# Altium PCB PCB1.PcbDoc (part 2 of 3)
Units mm, origin at the board's own origin, x right, y up, seen from the top; angles counter-clockwise.
Board outline 35.05 x 35.05 mm, 2 copper layers (Top Layer, Bottom Layer); 270 components, 213 nets, 927 pads, 0 vias.
Unrouted connection lines stored in the file: 589.
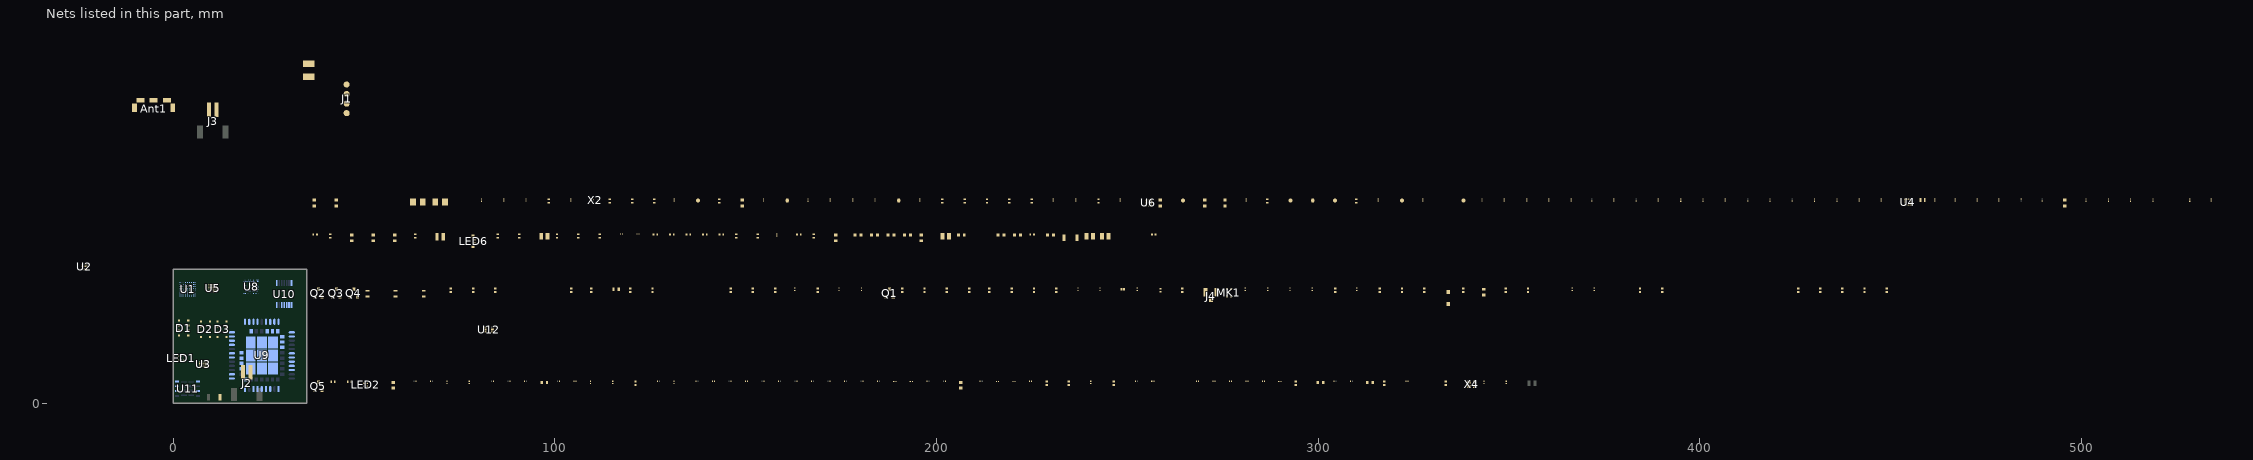
[diagram p2: the nets of this part, all layers, seen from the top]

## Part data (continued)
C17 C18: library part CC0603MRX5R5BB226, "CAP CER 22UF 6.3V X5R 0603", Case Code (Imperial)=0603, Case Code (Metric)=1608, Dielectric=X5R, LCSC Part Number=C109448, Manufacturer=Yageo, Max Operating Temperature=85°C, Min Operating Temperature=-55°C, Package Quantity=4000, Resistor Type=Ceramic, Supplier Part Number 1=603-CC603MRX5R5BB226, Tolerance=20%, Voltage Rating=6.3V, Capacitance=22uF, Case/Package=0603, Category="Ceramic Capacitors", ComponentLink1Description=http://www.mouser.com/ds/2/447/Yageo_UPY-GP_NP0_16V-to-50V_9-358835.pdf?src-supplier=Mouser, ComponentLink1URL=http://www.mouser.com/ds/2/447/Yageo_UPY-GP_NP0_16V-to-50V_9-358835.pdf?src-supplier=Mouser, ComponentLink2Description=http://www.yageo.com/documents/recent/UPY-GPHC_X5R_4V-to-50V_25.pdf?src-supplier=Digi-Key, ComponentLink2URL=http://www.yageo.com/documents/recent/UPY-GPHC_X5R_4V-to-50V_25.pdf?src-supplier=Digi-Key, Depth=0.8mm, Halogen Free="Halogen Free", Lead Free="Lead Free", Length=0.063inch, Manufacturer Part Number=CC0603MRX5R5BB226, Mount="Surface Mount", Packaging="Tape and Reel", Pricing 1="1=0.33000, 10=0.22500, 50=0.22500, 100=0.12800, 1000=0.07900, 10000=0.06500 (USD)", RoHS=Yes, RoHS Compliant=Yes, Stock 1=3030, Supplier 1=Mouser, Termination=SMD/SMT, Thickness=0.035inch, Voltage Rating (DC)=6.3V, Weight=7.1E-05oz, Width=0.031inch
C19 C21 C26: library part GRM033C81A105ME05D, "CAP CER 1UF 10V X6S 0201", Dielectric=1541DielectricType, LCSC Part Number=C237278, Manufacturer=Murata, Voltage Rating (DC)=10V, ComponentLink1Description=http://search.murata.co.jp/Ceramy/image/img/A01X/G101/ENG/GRM033C81A105ME05-01.pdf?src-supplier=Digikey, ComponentLink1URL=http://search.murata.co.jp/Ceramy/image/img/A01X/G101/ENG/GRM033C81A105ME05-01.pdf?src-supplier=Digikey, ComponentLink2Description=https://datasheet.octopart.com/GRM033C81A105ME05D-Murata-datasheet-86813717.pdf?src-supplier=Future+Electronics, ComponentLink2URL=https://datasheet.octopart.com/GRM033C81A105ME05D-Murata-datasheet-86813717.pdf?src-supplier=Future+Electronics, ComponentLink3Description=https://datasheet.octopart.com/GRM033C81A105ME05D-Murata-datasheet-165579666.pdf?src-supplier=TME, ComponentLink3URL=https://datasheet.octopart.com/GRM033C81A105ME05D-Murata-datasheet-165579666.pdf?src-supplier=TME, Height=390um, Item Type=Capacitors, Manufacturer Part Number=GRM033C81A105ME05D, Material=4241ConductorMaterial, Pricing="15000=0.0628, 30000=0.0611 (USD)", RoHS=Yes, Stock=165000, Supplier="Future Electronics"
C20 C23 C24 C25 C49 C52 C53 C54 C56 C57: library part GRM033C71C104KE14D, "CAP CER 0.1UF 16V X7S 0201", LCSC Part Number=C85923, Manufacturer=Murata, ComponentLink1Description=http://www.mouser.com/ds/2/281/c02e-2905.pdf?src-supplier=Mouser, ComponentLink1URL=http://www.mouser.com/ds/2/281/c02e-2905.pdf?src-supplier=Mouser, ComponentLink2Description=http://www.farnell.com/datasheets/2867828.pdf?src-supplier=Farnell, ComponentLink2URL=http://www.farnell.com/datasheets/2867828.pdf?src-supplier=Farnell, ComponentLink3Description=http://www.farnell.com/datasheets/2867828.pdf?src-supplier=Newark, ComponentLink3URL=http://www.farnell.com/datasheets/2867828.pdf?src-supplier=Newark, ComponentLink4Description=http://www.farnell.com/datasheets/2867828.pdf?src-supplier=Element14, ComponentLink4URL=http://www.farnell.com/datasheets/2867828.pdf?src-supplier=Element14, ComponentLink5Description=https://search.murata.co.jp/Ceramy/image/img/A01X/G101/ENG/GRM033C71C104KE14-01.pdf?src-supplier=Digikey, ComponentLink5URL=https://search.murata.co.jp/Ceramy/image/img/A01X/G101/ENG/GRM033C71C104KE14-01.pdf?src-supplier=Digikey, ComponentLink6Description=https://datasheet.octopart.com/GRM033C71C104KE14D-Murata-datasheet-22122223.pdf?src-supplier=Future+Electronics, ComponentLink6URL=https://datasheet.octopart.com/GRM033C71C104KE14D-Murata-datasheet-22122223.pdf?src-supplier=Future+Electronics, ComponentLink7Description=https://datasheet.octopart.com/GRM033C71C104KE14D-Murata-datasheet-165579666.pdf?src-supplier=TME, ComponentLink7URL=https://datasheet.octopart.com/GRM033C71C104KE14D-Murata-datasheet-165579666.pdf?src-supplier=TME, Item Type=Capacitors, Manufacturer Part Number=GRM033C71C104KE14D, Material=4241ConductorMaterial, Pricing="15000=0.0042, 45000=0.0041, 75000=0.004, 300000=0.0038, 450000=0.0037 (USD)", RoHS=Yes, Stock=15000, Supplier="Future Electronics"
C27 C28 C44 C45 C88 C89 C90 C91: library part GRM0335C1E2R0BA01D, "CAP CER 2PF 25V C0G/NP0 0201", LCSC Part Number=C161383, Manufacturer=Murata, Category="Ceramic Capacitors", ComponentLink1Description=https://datasheet.ciiva.com/29535/grm0335c1e2r0ba01-01-29535294.pdf?src-supplier=Digi-Key, ComponentLink1URL=https://datasheet.ciiva.com/29535/grm0335c1e2r0ba01-01-29535294.pdf?src-supplier=Digi-Key, Item Type=Capacitor, Manufacturer Part Number=GRM0335C1E2R0BA01D, Pricing 1="1=0.053, 10=0.0058, 25=0.004, 100=0.0026, 500=0.0024, 1000=0.0023, 3000=0.0022, 6000=0.0021, 15000=0.002, 30000=0.0019 (USD)", RoHS=Yes, Stock 1=65754, Supplier 1="Arrow Electronics", Supplier Part Number 1=GRM0335C1E2R0BA01D
C29: library part GRM033R71A472KA01D, "CAP CER 4700PF 10V X7R 0201", Case Code (Imperial)=0201, Case Code (Metric)=0603, Dielectric=X7R, LCSC Part Number=C85927, Manufacturer=Murata, Max Operating Temperature=125°C, Min Operating Temperature=-55°C, Package Quantity=1, Tolerance=10%, Voltage=10V, Case/Package=0201, ComponentLink1Description=https://datasheet.ciiva.com/129/product-129904.pdf?src-supplier=Digikey, ComponentLink1URL=https://datasheet.ciiva.com/129/product-129904.pdf?src-supplier=Digikey, ComponentLink2Description=https://datasheet.ciiva.com/129/grm033r71a472ka01-01-129903.pdf?src-supplier=Digikey, ComponentLink2URL=https://datasheet.ciiva.com/129/grm033r71a472ka01-01-129903.pdf?src-supplier=Digikey, ComponentLink3Description=https://datasheet.ciiva.com/18184/getdatasheetpartid-308657-18184073.pdf?src-supplier=Verical, ComponentLink3URL=https://datasheet.ciiva.com/18184/getdatasheetpartid-308657-18184073.pdf?src-supplier=Verical, ComponentLink4Description=https://datasheet.ciiva.com/29199/455736-da-01-en-vs-kondensator-0201-29199148.pdf?src-supplier=Conrad, ComponentLink4URL=https://datasheet.ciiva.com/29199/455736-da-01-en-vs-kondensator-0201-29199148.pdf?src-supplier=Conrad, ComponentLink5Description=https://datasheet.ciiva.com/7937/482872-7937598.pdf?src-supplier=Element14, ComponentLink5URL=https://datasheet.ciiva.com/7937/482872-7937598.pdf?src-supplier=Element14, ComponentLink6Description=https://datasheet.ciiva.com/7937/482872-7937597.pdf?src-supplier=Element14, ComponentLink6URL=https://datasheet.ciiva.com/7937/482872-7937597.pdf?src-supplier=Element14, ComponentLink7Description=https://datasheet.ciiva.com/129/grm033r71a472ka01-01-129905.pdf?src-supplier=Digikey, ComponentLink7URL=https://datasheet.ciiva.com/129/grm033r71a472ka01-01-129905.pdf?src-supplier=Digikey, ComponentLink8Description=https://datasheet.ciiva.com/11463/product-11463846.pdf?src-supplier=Avnet, ComponentLink8URL=https://datasheet.ciiva.com/11463/product-11463846.pdf?src-supplier=Avnet, Construction=Flat, Depth=0.3mm, Height=0.3mm, Item Type=Capacitors, Lead Free="Lead Free", Length=0.6mm, Manufacturer Part Number=GRM033R71A472KA01D, Material=Ceramic, Mounting Technology="Surface Mount", Packaging="Tape and Reel", Pricing="15000=0.0011, 75000=0.0011, 300000=0.001, 750000=0.001, 1875000=0.0009 (USD)", Radiation Hardening=No, Reach SVHC Compliant=No, RoHS=Yes, RoHS Compliant=Yes, Series=GRM, Stock=45000, Supplier="Future Electronics", Termination=SMD/SMT, Thickness=0.013inch, Voltage Rating=10V, Voltage Rating (DC)=10V, Width=0.012inch
C30 C39 C42: library part CC0402JRX7R9BB104, "CAP 0402 50V 100 NF X7R", Case/Package=343Case, Dielectric=1511DielectricType, LCSC Part Number=C5182432, Manufacturer=Yageo, Supplier Part Number=13-CC0402JRX7R9BB104TR-ND, Voltage Rating (DC)=50V, Category="Ceramic Capacitors", Item Type=Capacitor, Lead Free=5697LeadFree, Manufacturer Part Number=CC0402JRX7R9BB104, Pricing="10000=0.0157 (USD)", RoHS=No, Supplier=Digi-Key
C31: library part CC0603KRX7R0BB104, "CAP CER 0.1UF 100V X7R 0603", Capacitance=100nF, Case Code (Imperial)=0603, Case Code (Metric)=1608, Dielectric=X7R, LCSC Part Number=C113803, Manufacturer=Yageo, Max Operating Temperature=125°C, Min Operating Temperature=-55°C, Package Quantity=4000, Resistor Type=Ceramic, Supplier Part Number 1=311-1523-1-ND, Tolerance=10%, Voltage Rating=100V, Case/Package=0603, Category="Ceramic Capacitors", ComponentLink1Description=https://datasheet.ciiva.com/6277/mlccorderingcode-6277030.pdf?src-supplier=Digi-Key, ComponentLink1URL=https://datasheet.ciiva.com/6277/mlccorderingcode-6277030.pdf?src-supplier=Digi-Key, ComponentLink2Description=https://datasheet.ciiva.com/6277/mlccorderingcode-6277081.pdf?src-supplier=Digi-Key, ComponentLink2URL=https://datasheet.ciiva.com/6277/mlccorderingcode-6277081.pdf?src-supplier=Digi-Key, ComponentLink3Description=https://datasheet.ciiva.com/6277/mlccorderingcode-6277082.pdf?src-supplier=Digi-Key, ComponentLink3URL=https://datasheet.ciiva.com/6277/mlccorderingcode-6277082.pdf?src-supplier=Digi-Key, Depth=0.8mm, Item Type=Capacitor, Lead Free="Lead Free", Length=0.063inch, Manufacturer Part Number=CC0603KRX7R0BB104, Mount="Surface Mount", Packaging="Tape and Reel", Pricing 1="1=0.19000, 10=0.13500, 50=0.07680, 100=0.06370, 500=0.04466, 1000=0.03696 (USD)", RoHS=Yes, RoHS Compliant=Yes, Series=CC, Stock 1=60476, Supplier 1=Digi-Key, Termination=SMD/SMT, Thickness=0.035inch, Voltage Rating (DC)=100V, Weight=7.1E-05oz, Width=0.031inch
C32 C38 C40 C41: library part GRM188R61E106MA73J, "CAP CER 10UF 25V X5R 0603", Case Code (Imperial)=0603, Case Code (Metric)=1608, Dielectric=X5R, LCSC Part Number=C3833060, Manufacturer=Murata, Max Operating Temperature=85°C, Min Operating Temperature=-55°C, Package Quantity=10000, Supplier Part Number 1=490-12737-1-ND, Tolerance=20%, Voltage Rating=25V, Capacitance=10uF, Case/Package=0603, Composition=Ceramic, Height=0.8mm, Item Type=Capacitor, Length=0.063inch, Manufacturer Part Number=GRM188R61E106MA73J, Mount="Surface Mount", Packaging="Tape and Reel", Pricing 1="1=0.42, 10=0.293, 100=0.1756, 500=0.13172, 1000=0.11123, 2500=0.10537, 5000=0.09952 (USD)", Stock 1=47597, Supplier 1=Digi-Key, Termination=SMD/SMT, Thickness=0.039inch, Voltage Rating (DC)=25V, Weight=0.000222oz, Width=0.031inch
C33: library part 0603B105K250NT, "25V 1uF X7R ±10% 0603 Multilayer Ceramic Capacitors MLCC - SMD/SMT ROHS", LCSC Part Number=C59302, Manufacturer=FH, Package=0603, ComponentLink1Description=LCSC, ComponentLink1URL=https://www.lcsc.com/product-detail/Multilayer-Ceramic-Capacitors-MLCC-SMD-SMT_FH-Guangdong-Fenghua-Advanced-Tech-0603B105K250NT_C59302.html, Item Type=Capacitor, Manufacturer Part Number=0603B105K250NT
C34: library part GRM033R61A105ME15D, "CAP CER 1UF 10V X5R 0201", Dielectric=1537DielectricType, Manufacturer=Murata, Supplier Part Number=2088392, Voltage Rating (DC)=10V, Height=390um, Item Type=Capacitors, Manufacturer Part Number=GRM033R61A105ME15D, Material=4241ConductorMaterial, Pricing="15000=0.0577, 30000=0.0561 (USD)", RoHS=Yes, Stock=3090000, Supplier="Future Electronics"
C35 C36 C67 C75: library part GRM155R61A106ME44D, "10V 10uF X5R ±20% 0402 Multilayer Ceramic Capacitors MLCC - SMD/SMT ROHS", Case/Package=343Case, Dielectric=1537DielectricType, LCSC Part Number=C77000, Manufacturer=Murata, Voltage Rating (DC)=10V, Item Type=Capacitors, Length=1mm, Manufacturer Part Number=GRM155R61A106ME44D, Pricing="50=0.0103, 500=0.008, 1500=0.0068, 10000=0.0056, 50000=0.0055 (USD)", RoHS=Yes, Stock=574805, Supplier=LCSC, Thickness=500um, Width=500um
C37: library part CL05A105KO5NNNC, "CAP CER 1UF 16V X5R 0402", Case Code (Imperial)=0402, Case Code (Metric)=1005, Dielectric=X5R, LCSC Part Number=C29266, Manufacturer=Samsung, Max Operating Temperature=85°C, Min Operating Temperature=-55°C, Package Quantity=1, Tolerance=10%, Voltage=16V, Case/Package=0402, ComponentLink1Description=https://datasheet.ciiva.com/16207/cl05a105ko5nnnc-16207571.pdf?src-supplier=Future+Electronics, ComponentLink1URL=https://datasheet.ciiva.com/16207/cl05a105ko5nnnc-16207571.pdf?src-supplier=Future+Electronics, ComponentLink2Description=https://datasheet.ciiva.com/15195/getdatasheetpartid-355272-15195629.pdf?src-supplier=Verical, ComponentLink2URL=https://datasheet.ciiva.com/15195/getdatasheetpartid-355272-15195629.pdf?src-supplier=Verical, Construction=Flat, Depth=0.5mm, Height=0.5mm, Item Type=Capacitors, Length=1mm, Manufacturer Part Number=CL05A105KO5NNNC, Material=4241ConductorMaterial, Mounting Technology="Surface Mount", Packaging="Tape and Reel", Pricing="10000=0.00432, 20000=0.00423, 40000=0.00413, 60000=0.00403, 80000=0.00393 (USD)", Radiation Hardening=No, RoHS=Yes, RoHS Compliant=Yes, Series=CL, Stock=440000, Supplier=Avnet, Thickness=0.022inch, Voltage Rating=16V, Voltage Rating (DC)=16V, Width=0.02inch
C43: library part GRM033R71A103KA01D, "CAP CER 10000PF 10V X7R 0201", Case Code (Imperial)=0201, Case Code (Metric)=0603, Dielectric=X7R, LCSC Part Number=C76941, Manufacturer=Murata, Max Operating Temperature=125°C, Min Operating Temperature=-55°C, Package Quantity=1, Tolerance=10%, Voltage=10V, Case/Package=0201, ComponentLink1Description=https://datasheet.ciiva.com/129/grm033r71a103ka01-01-129814.pdf?src-supplier=Digikey, ComponentLink1URL=https://datasheet.ciiva.com/129/grm033r71a103ka01-01-129814.pdf?src-supplier=Digikey, ComponentLink2Description=https://datasheet.ciiva.com/129/grm033r71a103ka01-01-129815.pdf?src-supplier=Digikey, ComponentLink2URL=https://datasheet.ciiva.com/129/grm033r71a103ka01-01-129815.pdf?src-supplier=Digikey, ComponentLink3Description=https://datasheet.ciiva.com/11789/0900766b80ef921d-11789049.pdf?src-supplier=Rs, ComponentLink3URL=https://datasheet.ciiva.com/11789/0900766b80ef921d-11789049.pdf?src-supplier=Rs, ComponentLink4Description=https://datasheet.ciiva.com/16467/product-16467346.pdf?src-supplier=Future+Electronics, ComponentLink4URL=https://datasheet.ciiva.com/16467/product-16467346.pdf?src-supplier=Future+Electronics, ComponentLink5Description=https://datasheet.ciiva.com/18184/getdatasheetpartid-158821-18184066.pdf?src-supplier=Verical, ComponentLink5URL=https://datasheet.ciiva.com/18184/getdatasheetpartid-158821-18184066.pdf?src-supplier=Verical, ComponentLink6Description=https://datasheet.ciiva.com/29199/455719-da-01-en-vs-kondensator-0201-29199284.pdf?src-supplier=Conrad, ComponentLink6URL=https://datasheet.ciiva.com/29199/455719-da-01-en-vs-kondensator-0201-29199284.pdf?src-supplier=Conrad, ComponentLink7Description=https://datasheet.ciiva.com/5422/product-5422667.pdf?src-supplier=Mouser, ComponentLink7URL=https://datasheet.ciiva.com/5422/product-5422667.pdf?src-supplier=Mouser, Construction=Flat, Depth=0.3mm, Height=0.3mm, Item Type=Capacitors, Lead Free=5697LeadFree, Length=0.6mm, Manufacturer Part Number=GRM033R71A103KA01D, Material=Ceramic, Mounting Technology="Surface Mount", Packaging="Tape and Reel", Pricing="1=0.1, 10=0.006, 50=0.006, 100=0.004, 1000=0.004, 10000=0.004 (USD)", Radiation Hardening=No, Reach SVHC Compliant=No, RoHS=Yes, RoHS Compliant=Yes, Series=GRM, Stock=253762, Supplier=Mouser, Termination=SMD/SMT, Thickness=0.013inch, Voltage Rating=10V, Voltage Rating (DC)=10V, Width=0.012inch
C46 C47 C48 C50 C55 C86 C87: library part GRM155C71C105KE11D, "CAP CER 1UF 16V X7S 0402", Case/Package=343Case, Dielectric=1542DielectricType, LCSC Part Number=C576449, Manufacturer=Murata, Max Operating Temperature=125°C, Min Operating Temperature=-55°C, Tolerance=10%, Voltage Rating=16V, Height=600um, Item Type=Capacitors, Length=1mm, Manufacturer Part Number=GRM155C71C105KE11D, Material=4241ConductorMaterial, Pricing="1=0.11, 10=0.041, 50=0.041, 100=0.026, 1000=0.023, 10000=0.016 (USD)", RoHS=No, Stock=16102, Supplier=Mouser, Thickness=500um, Voltage Rating (DC)=16V, Width=500um
C51: library part GRM188C71C475KE21D, "CAP CER 4.7UF 16V X7S 0603", Case/Package=0603, Dielectric=1542DielectricType, LCSC Part Number=C237615, Manufacturer=Murata, Max Operating Temperature=125°C, Min Operating Temperature=-55°C, Tolerance=10%, Voltage Rating=16V, ComponentLink1Description=http://search.murata.co.jp/Ceramy/image/img/A01X/G101/ENG/GRM188C71C475KE21-01.pdf?src-supplier=Digikey, ComponentLink1URL=http://search.murata.co.jp/Ceramy/image/img/A01X/G101/ENG/GRM188C71C475KE21-01.pdf?src-supplier=Digikey, Height=950um, Item Type=Capacitors, Length=1.6mm, Manufacturer Part Number=GRM188C71C475KE21D, Material=4241ConductorMaterial, Mounting Technology="Surface Mount", Pricing="1=0.27, 10=0.113, 50=0.113, 100=0.075, 1000=0.067, 10000=0.046 (USD)", RoHS=Yes, RoHS Compliant=Yes, Series=GRM, Stock=23513, Supplier=Mouser, Thickness=800um, Voltage Rating (DC)=16V, Width=800um
C58: library part CL10Y225KO96PNC, "16V 2.2uF X7S ±10% 0603 Multilayer Ceramic Capacitors MLCC - SMD/SMT ROHS", LCSC Part Number=C22371069, Manufacturer=Samsung, Item Type=Capacitor, Manufacturer Part Number=CL10Y225KO96PNC, Pricing="1=0.24, 10=0.155, 50=0.155, 100=0.088, 1000=0.058, 10000=0.045 (USD)", RoHS=No, Stock=20471, Supplier=Mouser
C59 C74: library part GRM155R71C104KA88D, "CAP CER 0.1UF 16V X7R 0402", Case Code (Imperial)=0402, Case Code (Metric)=1005, Dielectric=X7R, Dielectric Material=Ceramic, Insulation Resistance=10GR, LCSC Part Number=C71629, Manufacturer=Murata, Max Operating Temperature=125°C, Min Operating Temperature=-55°C, Package Quantity=1, Tolerance=10%, Voltage=16V, Case/Package=0402, Category="Ceramic Capacitors", ComponentLink1Description=https://datasheet.ciiva.com/129/grm155r71c104ka88-01-129739.pdf?src-supplier=Digi-Key, ComponentLink1URL=https://datasheet.ciiva.com/129/grm155r71c104ka88-01-129739.pdf?src-supplier=Digi-Key, ComponentLink2Description=https://datasheet.ciiva.com/129/grm155r71c104ka88-01-129740.pdf?src-supplier=Digi-Key, ComponentLink2URL=https://datasheet.ciiva.com/129/grm155r71c104ka88-01-129740.pdf?src-supplier=Digi-Key, ComponentLink3Description=https://datasheet.ciiva.com/18102/getdatasheetpartid-85307-18102905.pdf?src-supplier=Verical, ComponentLink3URL=https://datasheet.ciiva.com/18102/getdatasheetpartid-85307-18102905.pdf?src-supplier=Verical, ComponentLink4Description=https://datasheet.ciiva.com/29199/454098-da-01-en-vs-kondensator-0402-29199799.pdf?src-supplier=Conrad, ComponentLink4URL=https://datasheet.ciiva.com/29199/454098-da-01-en-vs-kondensator-0402-29199799.pdf?src-supplier=Conrad, ComponentLink5Description=https://datasheet.ciiva.com/7937/4360-7937615.pdf?src-supplier=Element14, ComponentLink5URL=https://datasheet.ciiva.com/7937/4360-7937615.pdf?src-supplier=Element14, ComponentLink6Description=https://datasheet.ciiva.com/14116/grmseries-highdielectrictype-eng-14116878.pdf?src-supplier=Distrelec, ComponentLink6URL=https://datasheet.ciiva.com/14116/grmseries-highdielectrictype-eng-14116878.pdf?src-supplier=Distrelec, ComponentLink7Description=https://datasheet.ciiva.com/14103/grmseries-highdielectrictype-eng-14103750.pdf?src-supplier=Distrelec, ComponentLink7URL=https://datasheet.ciiva.com/14103/grmseries-highdielectrictype-eng-14103750.pdf?src-supplier=Distrelec, ComponentLink8Description=https://datasheet.ciiva.com/28534/4360-28534127.pdf?src-supplier=Element14, ComponentLink8URL=https://datasheet.ciiva.com/28534/4360-28534127.pdf?src-supplier=Element14, ComponentLink9Description=https://datasheet.ciiva.com/28534/4360-28534133.pdf?src-supplier=Element14, ComponentLink9URL=https://datasheet.ciiva.com/28534/4360-28534133.pdf?src-supplier=Element14, ComponentLink10Description=https://datasheet.ciiva.com/16199/product-16199000.pdf?src-supplier=Future+Electronics, ComponentLink10URL=https://datasheet.ciiva.com/16199/product-16199000.pdf?src-supplier=Future+Electronics, Depth=0.5mm, Height=0.5mm, Item Type=Capacitor, Lead Free="Lead Free", Length=1mm, Manufacturer Part Number=GRM155R71C104KA88D, Material=Ceramic, Mounting Technology="Surface Mount", Packaging="Tape and Reel", Pins=2, Pricing 1="10000=0.00480, 30000=0.00470, 100000=0.00350, 250000=0.00330 (USD)", Radiation Hardening=No, RoHS=Yes, RoHS Compliant=Yes, Series=GRM, Stock 1=1690322, Supplier 1="Arrow Electronics", Supplier Part Number 1=GRM155R71C104KA88D, Termination=SMD/SMT, Thickness=0.022inch, Voltage Rating=16V, Voltage Rating (DC)=16V, Width=0.02inch
C60: library part TAJB107M010RNJ, "CAP TANT 100UF 20% 10V 1411", Case Code (Imperial)=1210, Case Code (Metric)=3528, Dielectric Material=Tantalum, ESR (Equivalent Series Resistance)=1.4R, LCSC Part Number=C7196, Leakage Current=10uA, Manufacturer="Kyocera AVX", Max Operating Temperature=125°C, Min Operating Temperature=-55°C, Package Quantity=2000, Supplier Part Number 1=1354069, Tolerance=10%, Voltage=10V, Case/Package=1210, Category="Tantalum Capacitors", ComponentLink1Description=https://datasheet.ciiva.com/264/taj-264281.pdf?src-supplier=Digi-Key, ComponentLink1URL=https://datasheet.ciiva.com/264/taj-264281.pdf?src-supplier=Digi-Key, ComponentLink2Description=https://datasheet.ciiva.com/264/taj-264280.pdf?src-supplier=Digi-Key, ComponentLink2URL=https://datasheet.ciiva.com/264/taj-264280.pdf?src-supplier=Digi-Key, ComponentLink3Description=https://datasheet.ciiva.com/264/taj-264282.pdf?src-supplier=Digi-Key, ComponentLink3URL=https://datasheet.ciiva.com/264/taj-264282.pdf?src-supplier=Digi-Key, ComponentLink4Description=https://datasheet.ciiva.com/11225/taj-11225964.pdf?src-supplier=Avnet, ComponentLink4URL=https://datasheet.ciiva.com/11225/taj-11225964.pdf?src-supplier=Avnet, ComponentLink5Description=https://datasheet.ciiva.com/11225/taj-11225963.pdf?src-supplier=Avnet, ComponentLink5URL=https://datasheet.ciiva.com/11225/taj-11225963.pdf?src-supplier=Avnet, Construction=Flat, Depth=2.8mm, Dissipation Factor=8%, Features="General Purpose", Height=2.1mm, Item Type=Capacitor, Lead Free="Lead Free", Length=3.5mm, Manufacturer Part Number=TAJB107M010RNJ, Mounting Technology="Surface Mount", Packaging="Tape and Reel", Pricing 1="2000=0.302 (GBP)", Radiation Hardening=No, Reach SVHC Compliant=No, RoHS=Yes, RoHS Compliant=Yes, Series=TAJ, Stock 1=17520, Supplier 1=Rs, Termination=SMD/SMT, Voltage Rating=10V, Voltage Rating (DC)=10V, Width=2.8mm
C61 C65 C66 C76: library part 0402F104M500NT, "50V 100nF Y5V ±20% 0402 Multilayer Ceramic Capacitors MLCC - SMD/SMT ROHS", LCSC Part Number=C1581, Manufacturer=FH, ComponentLink1Description=LCSC, ComponentLink1URL=https://lcsc.com/product-detail/Multilayer-Ceramic-Capacitors-MLCC-SMD-SMT_FH-Guangdong-Fenghua-Advanced-Tech-0402F104M500NT_C1581.html, Item Type=Capacitor, Manufacturer Part Number=0402F104M500NT
C62: library part TMK107BBJ106MA-T, "CAP CER 10UF 25V X5R 0603", Case Code (Imperial)=0603, Case Code (Metric)=1608, LCSC Part Number=C386081, Manufacturer="Taiyo Yuden", Max Operating Temperature=85°C, Min Operating Temperature=-55°C, Supplier Part Number 1=587-6023-1-ND, Tolerance=20%, Voltage Rating=25V, Capacitance=10uF, Case/Package=0603, ComponentLink1Description=http://ds.yuden.co.jp/TYCOMPAS/ut/detail.do?productNo=TMK107BBJ106MA-T&fileName=TMK107BBJ106MA-T_SS&mode=specSheetDownload&src-supplier=Digi-Key, ComponentLink1URL=http://ds.yuden.co.jp/TYCOMPAS/ut/detail.do?productNo=TMK107BBJ106MA-T&fileName=TMK107BBJ106MA-T_SS&mode=specSheetDownload&src-supplier=Digi-Key, Lead Free="Lead Free", Manufacturer Part Number=TMK107BBJ106MA-T, Mount="Surface Mount", Packaging="Tape and Reel", Pricing 1="1=0.46, 10=0.32, 50=0.2238, 100=0.1918, 500=0.14386, 1000=0.12149 (USD)", RoHS Compliant=Yes, Stock 1=85333, Supplier 1=Digi-Key
C63 C68 C70 C79 C82 C84: library part GRM1555C1H100JA01D, "CAP CER 10PF 50V C0G/NP0 0402", Case Code (Imperial)=0402, Case Code (Metric)=1005, Dielectric=C0G, LCSC Part Number=C76946, Manufacturer=Murata, Max Operating Temperature=125°C, Min Operating Temperature=-55°C, Package Quantity=1, Tolerance=5%, Voltage=50V, Case/Package=0402, Category="Ceramic Capacitors", ComponentLink1Description=https://datasheet.ciiva.com/2989/product-2989280.pdf?src-supplier=Avnet, ComponentLink1URL=https://datasheet.ciiva.com/2989/product-2989280.pdf?src-supplier=Avnet, ComponentLink2Description=https://datasheet.ciiva.com/18184/getdatasheetpartid-307234-18184164.pdf?src-supplier=Verical, ComponentLink2URL=https://datasheet.ciiva.com/18184/getdatasheetpartid-307234-18184164.pdf?src-supplier=Verical, ComponentLink3Description=https://datasheet.ciiva.com/29200/453545-da-01-en-vs-kondensator-0402-29200107.pdf?src-supplier=Conrad, ComponentLink3URL=https://datasheet.ciiva.com/29200/453545-da-01-en-vs-kondensator-0402-29200107.pdf?src-supplier=Conrad, ComponentLink4Description=https://datasheet.ciiva.com/7828/1666664-7828812.pdf?src-supplier=Element14, ComponentLink4URL=https://datasheet.ciiva.com/7828/1666664-7828812.pdf?src-supplier=Element14, ComponentLink5Description=https://datasheet.ciiva.com/6271/partnumbering-e-01-6271159.pdf?src-supplier=Digi-Key, ComponentLink5URL=https://datasheet.ciiva.com/6271/partnumbering-e-01-6271159.pdf?src-supplier=Digi-Key, ComponentLink6Description=https://datasheet.ciiva.com/6271/partnumbering-e-01-6271158.pdf?src-supplier=Digi-Key, ComponentLink6URL=https://datasheet.ciiva.com/6271/partnumbering-e-01-6271158.pdf?src-supplier=Digi-Key, ComponentLink7Description=https://datasheet.ciiva.com/6271/partnumbering-e-01-6271068.pdf?src-supplier=Digi-Key, ComponentLink7URL=https://datasheet.ciiva.com/6271/partnumbering-e-01-6271068.pdf?src-supplier=Digi-Key, Construction=Flat, Depth=0.5mm, Height=0.5mm, Item Type=Capacitor, Lead Free="Lead Free", Length=1mm, Manufacturer Part Number=GRM1555C1H100JA01D, Material=Ceramic, Mounting Technology="Surface Mount", Packaging="Tape and Reel", Pricing="10000=0.0034, 50000=0.0027, 100000=0.0023, 250000=0.0021 (USD)", Radiation Hardening=No, Reach SVHC Compliant=No, RoHS=Yes, RoHS Compliant=Yes, Series=GRM, Stock=3860000, Supplier="Arrow Electronics", Supplier Part Number=GRM1555C1H100JA01D, Termination=SMD/SMT, Thickness=0.022inch, Voltage Rating=50V, Voltage Rating (DC)=50V, Width=0.02inch
C64 C69 C71 C80 C83 C85: library part CC0402JRNPO9BN300, "CAP CER 30PF 50V C0G/NPO 0402", Manufacturer=Yageo, Supplier Part Number 1=6784771, Temperature Coefficient=30ppm/°C, Category="Ceramic Capacitors", ComponentLink1Description=https://datasheet.ciiva.com/13263/upy-gp-np0-16v-to-50v-8-3714-13263961.pdf?src-supplier=Mouser, ComponentLink1URL=https://datasheet.ciiva.com/13263/upy-gp-np0-16v-to-50v-8-3714-13263961.pdf?src-supplier=Mouser, Halogen Free=5694HalogenFree, Item Type=Capacitor, Manufacturer Part Number=CC0402JRNPO9BN300, Pricing 1="10000=0.0025, 40000=0.0024, 150000=0.0023, 400000=0.0022, 1000000=0.0021 (USD)", RoHS=Yes, Stock 1=540000, Supplier 1="Future Electronics"
C72 C73 C77 C78 C81: library part GRM1555C1E330JA01D, "CAP CER 33PF 25V C0G/NP0 0402", Case Code (Imperial)=0402, Case Code (Metric)=1005, Dielectric=C0G, LCSC Part Number=C441758, Manufacturer=Murata, Max Operating Temperature=125°C, Min Operating Temperature=-55°C, Package Quantity=1, Supplier Part Number 1=490-6177-1-ND, Tolerance=5%, Voltage=25V, Capacitance=33pF, Case/Package=0402, ComponentLink1Description=https://www.murata.com/~/media/webrenewal/support/library/catalog/products/capacitor/mlcc/c02e.ashx?la=en-us&src-supplier=Digi-Key, ComponentLink1URL=https://www.murata.com/~/media/webrenewal/support/library/catalog/products/capacitor/mlcc/c02e.ashx?la=en-us&src-supplier=Digi-Key, ComponentLink2Description=http://www.mouser.com/ds/2/281/c02e-2905.pdf?src-supplier=Mouser, ComponentLink2URL=http://www.mouser.com/ds/2/281/c02e-2905.pdf?src-supplier=Mouser, ComponentLink3Description=http://psearch.murata.com/capacitor/product/GRM1555C1E330JA01%23.pdf?src-supplier=Avnet, ComponentLink3URL=http://psearch.murata.com/capacitor/product/GRM1555C1E330JA01%23.pdf?src-supplier=Avnet, Construction=Flat, Depth=0.5mm, Height=0.5mm, Item Type=Capacitor, Lead Free="Lead Free", Length=1mm, Manufacturer Part Number=GRM1555C1E330JA01D, Mount="Surface Mount", Packaging="Tape and Reel", Pricing 1="1=0.1, 10=0.034, 50=0.0184, 100=0.0151, 500=0.01078, 1000=0.00847, 2500=0.0077, 5000=0.00708 (USD)", Radiation Hardening=No, RoHS Compliant=Yes, Series=GRM, Stock 1=250773, Supplier 1=Digi-Key, Termination=SMD/SMT, Thickness=0.022inch, Voltage Rating=25V, Voltage Rating (DC)=25V, Width=0.02inch
C92: library part CC0201JRX7R7BB222, "CAP CER 2200PF 16V X7R 0201", Case/Package=0201, Dielectric=X7R, LCSC Part Number=C526940, Manufacturer=Yageo, Max Operating Temperature=125°C, Min Operating Temperature=-55°C, Tolerance=5%, Voltage Rating=16V, ComponentLink1Description=http://www.yageo.com/documents/recent/UPY-GPHC_X7R_6.3V-to-50V_18.pdf?src-supplier=Digikey, ComponentLink1URL=http://www.yageo.com/documents/recent/UPY-GPHC_X7R_6.3V-to-50V_18.pdf?src-supplier=Digikey, Halogen Free="Halogen Free", Item Type=Capacitors, Lead Free="Lead Free", Manufacturer Part Number=CC0201JRX7R7BB222, Mounting Technology="Surface Mount", Packaging="Tape and Reel", Pricing="1=0.1, 10=0.035, 50=0.02, 100=0.0155, 500=0.0117, 1000=0.00919, 2500=0.00836, 5000=0.00769 (USD)", RoHS=Yes, Series=CC, Stock=18403, Supplier=Digikey, Voltage Rating (DC)=16V
C93 C94: library part GJM0335C1ER70WB01D, "CAP CER 0.70PF 25V NP0 0201", LCSC Part Number=C907945, Manufacturer=Murata, ComponentLink1Description=https://datasheet.ciiva.com/170/product-170844.pdf?src-supplier=Digikey, ComponentLink1URL=https://datasheet.ciiva.com/170/product-170844.pdf?src-supplier=Digikey, ComponentLink2Description=https://datasheet.ciiva.com/11616/product-11616940.pdf?src-supplier=Avnet, ComponentLink2URL=https://datasheet.ciiva.com/11616/product-11616940.pdf?src-supplier=Avnet, Item Type=Capacitors, Manufacturer Part Number=GJM0335C1ER70WB01D, Pricing="1=0.13, 10=0.051, 50=0.051, 100=0.031, 1000=0.025, 10000=0.02 (USD)", RoHS=Yes, Stock=12907, Supplier=Mouser
D1 D2 D3: "VEMD Series 850 nM ±65° Surface Mount Silicon PIN Photodiode", LCSC Part Number=C511402, Manufacturer="Vishay Semiconductors", ComponentLink1Description=https://www.vishay.com/docs/84565/vemd8080.pdf?src-supplier=Digikey, ComponentLink1URL=https://www.vishay.com/docs/84565/vemd8080.pdf?src-supplier=Digikey, ComponentLink2Description=https://datasheet.octopart.com/VEMD8080-Vishay-datasheet-117816384.pdf?src-supplier=Future+Electronics, ComponentLink2URL=https://datasheet.octopart.com/VEMD8080-Vishay-datasheet-117816384.pdf?src-supplier=Future+Electronics, Item Type=Photodiodes, Manufacturer Part Number=VEMD8080, Pricing="1=2.18, 10=1.51, 50=1.51, 100=1.16, 1000=0.89, 10000=0.796 (USD)", Stock=45223, Supplier=Mouser
D4: "DIODE ZENER 5.1V 500MW SOD123", Breakdown Voltage=5.36V, Case/Package=SOD-123-2, Forward Voltage=900mV, LCSC Part Number=C66198, Manufacturer="ON Semiconductor", Max Operating Temperature=150°C, Max Power Dissipation=500mW, Max Reverse Current=5uA, Min Operating Temperature=-55°C, Package Quantity=3000, Supplier Part Number 1=70099546, Test Current=20mA, Tolerance=5%, Voltage Rating (DC)=5.1V, Zener Current=10mA, Category="Zener Diodes", ComponentLink1Description=https://datasheet.ciiva.com/23815/1708301-23815376.pdf?src-supplier=Newark, ComponentLink1URL=https://datasheet.ciiva.com/23815/1708301-23815376.pdf?src-supplier=Newark, ComponentLink2Description=https://datasheet.ciiva.com/22626/1708301-22626967.pdf?src-supplier=Element14, ComponentLink2URL=https://datasheet.ciiva.com/22626/1708301-22626967.pdf?src-supplier=Element14, ComponentLink3Description=https://datasheet.ciiva.com/4731/mmsz5221bt1-d-4731452.pdf?src-supplier=Mouser, ComponentLink3URL=https://datasheet.ciiva.com/4731/mmsz5221bt1-d-4731452.pdf?src-supplier=Mouser, ComponentLink4Description=https://datasheet.ciiva.com/16200/mmsz5221bt1-d-16200104.pdf?src-supplier=Future+Electronics, ComponentLink4URL=https://datasheet.ciiva.com/16200/mmsz5221bt1-d-16200104.pdf?src-supplier=Future+Electronics, ComponentLink5Description=https://datasheet.ciiva.com/894/mmsz5221bt1-d-894882.pdf?src-supplier=Digi-Key, ComponentLink5URL=https://datasheet.ciiva.com/894/mmsz5221bt1-d-894882.pdf?src-supplier=Digi-Key, ComponentLink6Description=https://datasheet.ciiva.com/894/mmsz5221bt1-d-894883.pdf?src-supplier=Digi-Key, ComponentLink6URL=https://datasheet.ciiva.com/894/mmsz5221bt1-d-894883.pdf?src-supplier=Digi-Key, ComponentLink7Description=https://datasheet.ciiva.com/894/mmsz5221bt1-d-894881.pdf?src-supplier=Digi-Key, ComponentLink7URL=https://datasheet.ciiva.com/894/mmsz5221bt1-d-894881.pdf?src-supplier=Digi-Key, Height=1.12mm, Impedance=17R, Item Type=Diode, Lead Free="Lead Free", Length=2.69mm, Manufacturer Part Number=MMSZ5231BT1G, Material=Plastic, Max Reverse Leakage Current=5uA, Packaging="Tape and Reel", Pins=2, Power Dissipation=500mW, Power Rating=500mW, Reach SVHC Compliant=No, RoHS=Yes, RoHS Compliant=Yes, Series="Automotive, AEC-Q101", Supplier 1="Allied Electronics", Voltage Tolerance=5%, Width=1.6mm, Working Voltage=5.1V, Zener Voltage=5.1V
D5: "40V Bidirectional 5V DFN1006-2 ESD and Surge Protection (TVS/ESD) ROHS", LCSC Part Number=C7472903, Manufacturer="TECH PUBLIC", Package=DFN1006-2, ComponentLink1Description=LCSC, ComponentLink1URL=https://www.lcsc.com/product-detail/ESD-and-Surge-Protection-TVS-ESD_TECH-PUBLIC-LXES15AAA1-153_C7472903.html, Item Type=(TVS/ESD), Manufacturer Part Number=LXES15AAA1-153
FB2: library part MFBM1V1005-102-R, "FERRITE BEAD 1 OHM 0402 1LN", Manufacturer="Eaton Bussmann", Category="Ferrite Beads and Chips", ComponentLink1Description=https://datasheet.octopart.com/MFBM1V1005-102-R-Cooper-Bussmann-datasheet-147669133.pdf?src-supplier=Sager+Electronics, ComponentLink1URL=https://datasheet.octopart.com/MFBM1V1005-102-R-Cooper-Bussmann-datasheet-147669133.pdf?src-supplier=Sager+Electronics, Item Type="Ferrite Bead", Manufacturer Part Number=MFBM1V1005-102-R, Pricing="10000=0.0074, 30000=0.0072, 50000=0.0067 (USD)", RoHS=No, Stock=60000, Supplier="Arrow Electronics", Supplier Part Number=MFBM1V1005-102-R
J1: "Pogo Pad 2.5mm 4 Pin", Item Type="Pogo Connector", Manufacturer Part Number="POGO Connector 4 Pin"
J2 J3: "CONN HEADER SMD R/A 2POS 2MM", Color=46,47Colour, Contact Resistance=20mR, Current Rating=3A, Flammability Rating="UL94 V-0", Housing Color=50Colour, Insulation Color=Natural, Insulation Resistance=1GR, LCSC Part Number=C295747, Manufacturer=JST, Max Current Rating=2A, Max Operating Temperature=85°C, Max Voltage Rating (AC)=100V, Min Operating Temperature=-25°C, ComponentLink1Description=http://www.farnell.com/datasheets/1699381.pdf?src-supplier=Farnell, ComponentLink1URL=http://www.farnell.com/datasheets/1699381.pdf?src-supplier=Farnell, ComponentLink2Description=http://datasheet.octopart.com/S2B-PH-SM4-TB-%28LF%29%28SN%29-JST-datasheet-12510261.pdf?src-supplier=Distrelec, ComponentLink2URL=http://datasheet.octopart.com/S2B-PH-SM4-TB-%28LF%29%28SN%29-JST-datasheet-12510261.pdf?src-supplier=Distrelec, ComponentLink3Description=http://www.farnell.com/datasheets/1699381.pdf?src-supplier=Newark, ComponentLink3URL=http://www.farnell.com/datasheets/1699381.pdf?src-supplier=Newark, ComponentLink4Description=https://datasheet.octopart.com/S2B-PH-SM4-TB%28LF%29%28SN%29-JST-datasheet-56537.pdf?src-supplier=Future+Electronics, ComponentLink4URL=https://datasheet.octopart.com/S2B-PH-SM4-TB%28LF%29%28SN%29-JST-datasheet-56537.pdf?src-supplier=Future+Electronics, ComponentLink5Description=http://www.farnell.com/datasheets/1699381.pdf?src-supplier=Element14, ComponentLink5URL=http://www.farnell.com/datasheets/1699381.pdf?src-supplier=Element14, ComponentLink6Description=https://datasheet.octopart.com/S2B-PH-SM4-TB-%28LF%29%28SN%29-JST-datasheet-12510261.pdf?src-supplier=TME, ComponentLink6URL=https://datasheet.octopart.com/S2B-PH-SM4-TB-%28LF%29%28SN%29-JST-datasheet-12510261.pdf?src-supplier=TME, Connector Type=Header, Contact Finish - Mating=TIN, Contact Material="Copper Alloy", Contact Mating Length=3.302mm, Contact Plating=154ConductorMaterial, Contact Shape=Square, Contact Type="Male Pin", Depth=7.6mm, Fastening Type=Detent, Gender=29Gender, Height=6mm, Housing Material=4302ConductorMaterial, Insulation Material=Nylon, Item Type=Connectors, Lead Free=5697LeadFree, Lead Pitch=2mm, Length=11.9mm, Manufacturer Part Number=S2B-PH-SM4-TB(LF)(SN), Mounting Technology="Surface Mount", Number of Contacts=2NUMBER, Number of Poles=2NUMBER, Number of Positions=2, Number of Rows=1, Orientation=5496OrientationType, Packaging="Cut Tape", Pins=2NUMBER, Pitch=2mm, Pricing="1000=0.27, 2000=0.265, 3000=0.265, 4000=0.26, 5000=0.25 (USD)", Reach SVHC Compliant=4186SVHC, RoHS=No, Series=PH, Stock=5000, Supplier="Future Electronics", Termination=Solder, Voltage Rating=100V, Voltage Rating (AC)=100V, Voltage Rating (DC)=100V, Weight=28.349523g, Width=2.34mm, Working Voltage=100V
J4: "CONN U.FL RCPT STR 50 OHM SMD", Case/Package=SMD/SMT, LCSC Part Number=C88374, Manufacturer=Hirose, Package Quantity=10000, Supplier Part Number 1=U.FL-R-SMT-1(80)-CUTT, ComponentLink1Description=https://www.hirose.com/product/en/download_file/key_name/U.FL-R-SMT-1%2880%29/category/Specification%20Sheet/doc_file_id/37638/?file_category_id=9&item_id=03310472280&is_series=&src-supplier=Digi-Key, ComponentLink1URL=https://www.hirose.com/product/en/download_file/key_name/U.FL-R-SMT-1%2880%29/category/Specification%20Sheet/doc_file_id/37638/?file_category_id=9&item_id=03310472280&is_series=&src-supplier=Digi-Key, ComponentLink2Description=http://www.mouser.com/ds/2/185/U.FL_catalog-939761.pdf?src-supplier=Mouser, ComponentLink2URL=http://www.mouser.com/ds/2/185/U.FL_catalog-939761.pdf?src-supplier=Mouser, Item Type="UFL Connector", Lead Free="Lead Free", Manufacturer Part Number=U.FL-R-SMT-1(80), Packaging="Tape and Reel", Pricing 1="1=1.07, 500=0.785, 1500=0.74, 2500=0.72, 5000=0.695 (USD)", Stock 1=1272, Supplier 1="Future Electronics"
L1 L2 L3 L4: library part DFE201612E-2R2M=P2, "FIXED IND 2.2UH 1.8A 116MOHM SMD", Current Rating=1.8A, Inductance Tolerance=20%, LCSC Part Number=C337893, Manufacturer=Murata, Manufacturer Part Number=DFE201612E-2R2M=P2, Max Operating Temperature=125°C, Min Operating Temperature=-40°C, Saturation Current=2.4A, Test Frequency=1MHz, ComponentLink1Description=http://www.farnell.com/datasheets/2339714.pdf?src-supplier=Farnell, ComponentLink1URL=http://www.farnell.com/datasheets/2339714.pdf?src-supplier=Farnell, ComponentLink2Description=https://search.murata.co.jp/Ceramy/image/img/P02/J(E)TE243A-0006.pdf?src-supplier=Digikey, ComponentLink2URL=https://search.murata.co.jp/Ceramy/image/img/P02/J(E)TE243A-0006.pdf?src-supplier=Digikey, ComponentLink3Description=http://www.farnell.com/datasheets/2339714.pdf?src-supplier=Newark, ComponentLink3URL=http://www.farnell.com/datasheets/2339714.pdf?src-supplier=Newark, ComponentLink4Description=https://datasheet.octopart.com/DFE201612E-2R2M%3DP2-Murata-datasheet-150582460.pdf?src-supplier=Arrow.cn, ComponentLink4URL=https://datasheet.octopart.com/DFE201612E-2R2M%3DP2-Murata-datasheet-150582460.pdf?src-supplier=Arrow.cn, ESR=116mR, Height=1.2mm, Item Type=Inductors, Packaging=13Packaging, Pricing="1=0.31, 10=0.202, 50=0.202, 100=0.158, 1000=0.145, 10000=0.104 (USD)", RMS Current (Irms)=1.8A, RoHS=Yes, Stock=140327, Supplier=Mouser
L5: library part WPN252012H1R0MT, "FIXED IND 1UH 3A 54 MOHM SMD", LCSC Part Number=C98348, Manufacturer=Sunlord, Supplier Part Number 1=3442-WPN252012H1R0MTCT-ND, Category="Fixed Inductors", ComponentLink1Description=LCSC, ComponentLink1URL=https://www.lcsc.com/product-detail/Power-Inductors_Sunlord-WPN252012H1R0MT_C98348.html, Item Type=Inductor, Manufacturer Part Number=WPN252012H1R0MT, Pricing 1="1=0.46000, 10=0.40400, 25=0.37520, 50=0.31760, 100=0.28880, 250=0.27144, 500=0.24256, 1000=0.19635 (USD)", RoHS=Yes, Stock 1=4813, Supplier 1=Digi-Key
L6 L7 L8: library part MLZ1608M100WT000, "FIXED IND 10UH 250MA 1.05OHM SMD", Case Code (Imperial)=0603, Case Code (Metric)=1608, Current Rating=250mA, DC Resistance (DCR)=1.365R, LCSC Part Number=C76798, Manufacturer=TDK, Max Operating Temperature=125°C, Min Operating Temperature=-55°C, Package Quantity=4000, Saturation Current=90mA, Self Resonant Frequency=50MHz, Test Frequency=2MHz, Tolerance=20%, Case/Package=0603, ComponentLink1Description=https://product.tdk.com/info/en/catalog/datasheets/inductor_commercial_decoupling_mlz1608_en.pdf?src-supplier=Digikey, ComponentLink1URL=https://product.tdk.com/info/en/catalog/datasheets/inductor_commercial_decoupling_mlz1608_en.pdf?src-supplier=Digikey, ComponentLink2Description=https://datasheet.octopart.com/MLZ1608M100WT000-TDK-datasheet-12356712.pdf?src-supplier=Newark, ComponentLink2URL=https://datasheet.octopart.com/MLZ1608M100WT000-TDK-datasheet-12356712.pdf?src-supplier=Newark, ComponentLink3Description=https://datasheet.octopart.com/MLZ1608M100WT000-TDK-datasheet-38159369.pdf?src-supplier=Future+Electronics, ComponentLink3URL=https://datasheet.octopart.com/MLZ1608M100WT000-TDK-datasheet-38159369.pdf?src-supplier=Future+Electronics, Core Material=Ferrite, ESR=1.05R, Height=950um, Height - Seated (Max)=0.037inch, Item Type=Inductors, Length=0.063inch, Manufacturer Part Number=MLZ1608M100WT000, Mounting Technology="Surface Mount", Packaging="Cut Tape", Pricing="1=0.14, 10=0.09, 25=0.0804, 50=0.0706, 100=0.0617, 250=0.05292 (USD)", RMS Current (Irms)=250mA, RoHS=Yes, RoHS Compliant=Yes, Series=MLZ, Shielding=Shielded, Stock=146199, Supplier=Digikey, Width=0.031inch
L9: library part 0603CS-68NXJLW, "Ind Chip Wirewound 68nH 5% 200MHz 37Q-Factor Ceramic 600mA 0603", Case/Package=0603, DC Resistance (DCR)=340mR, Manufacturer=Coilcraft, Max DC Current=600mA, Max Operating Temperature=125°C, Min Operating Temperature=-40°C, Self Resonant Frequency=1.7GHz, Supplier Part Number 1=994-0603CS-68NXJLW, Test Frequency=200MHz, Tolerance=5%, Category="Fixed Inductors", ComponentLink1Description=http://www.mouser.com/ds/2/597/0603cs-270694.pdf?src-supplier=Mouser, ComponentLink1URL=http://www.mouser.com/ds/2/597/0603cs-270694.pdf?src-supplier=Mouser, Core Material=Ceramic, Height=1.02mm, Inductance=68nH, Item Type=Inductor, Lead Free="Contains Lead", Length=1.8mm, Manufacturer Part Number=0603CS-68NXJLW, Packaging="Tape and Reel", Pricing 1="1=0.96000, 10=0.95200, 50=0.95200, 100=0.95200, 1000=0.36200, 10000=0.30900 (USD)", Q Factor=21, RoHS=Yes, RoHS Compliant=Yes, Series=0603CS, Stock 1=3257, Supplier 1=Mouser, Termination=SMD/SMT, Weight=7.1E-05oz, Width=1.12mm
L10 L11: library part LQP03HQ2N2B02D, "FIXED IND 2.2NH 600MA 120MOHM SM", LCSC Part Number=C1329438, Manufacturer=Murata, RMS Current (Irms)=600mA, ComponentLink1Description=https://datasheet.octopart.com/LQP03HQ2N2B02D-Murata-datasheet-68295820.pdf?src-supplier=Future+Electronics, ComponentLink1URL=https://datasheet.octopart.com/LQP03HQ2N2B02D-Murata-datasheet-68295820.pdf?src-supplier=Future+Electronics, ComponentLink2Description=http://search.murata.co.jp/Ceramy/image/img/P02/JELF243C-0021.pdf?src-supplier=Digikey, ComponentLink2URL=http://search.murata.co.jp/Ceramy/image/img/P02/JELF243C-0021.pdf?src-supplier=Digikey, ComponentLink3Description=https://search.murata.co.jp/Ceramy/image/img/P02/JELF243C-0021.pdf?src-supplier=Digikey, ComponentLink3URL=https://search.murata.co.jp/Ceramy/image/img/P02/JELF243C-0021.pdf?src-supplier=Digikey, ComponentLink4Description=https://datasheet.octopart.com/LQP03HQ2N2B02D-Murata-datasheet-112158819.pdf?src-supplier=Newark, ComponentLink4URL=https://datasheet.octopart.com/LQP03HQ2N2B02D-Murata-datasheet-112158819.pdf?src-supplier=Newark, ComponentLink5Description=https://datasheet.octopart.com/LQP03HQ2N2B02D-Murata-datasheet-150539062.pdf?src-supplier=Arrow.cn, ComponentLink5URL=https://datasheet.octopart.com/LQP03HQ2N2B02D-Murata-datasheet-150539062.pdf?src-supplier=Arrow.cn, ESR=120mR, Height=420um, Item Type=Inductors, Manufacturer Part Number=LQP03HQ2N2B02D, Pricing="1=0.15, 10=0.096, 50=0.096, 100=0.075, 1000=0.061, 10000=0.056 (USD)", Q Factor=20NUMBER, RoHS=Yes, Stock=22323, Supplier=Mouser
LED1: "Infrared Emitters Green / Red / IR LED 530nm, 655nm, 940nm", Color=49,52Colour, Forward Current=20mA, Manufacturer="Osram Opto", Max Operating Temperature=85°C, Min Operating Temperature=-40°C, Reverse Voltage=5V, Supplier Part Number=720-SFH7016, Height=550um, Item Type=LEDs, Length=2.5mm, Manufacturer Part Number="SFH 7016", Pricing="1=1.67, 10=1.06, 50=1.06, 100=0.782, 1000=0.696, 10000=0.637 (USD)", RoHS=Yes, Stock=14170, Supplier=Mouser, Viewing Angle=120°, Width=1.6mm
LED2: "Colorless transparence -40℃~+150℃ 正贴 RGB 120° 1010 Light Emitting Diodes (LED) ROHS", LCSC Part Number=C5349953, Manufacturer=XINGLIGHT, Package=1010, ComponentLink1Description=LCSC, ComponentLink1URL=https://www.lcsc.com/product-detail/Light-Emitting-Diodes-LED_XINGLIGHT-XL-1010RGBC-WS2812B_C5349953.html, Item Type="RGB LED", Manufacturer Part Number=XL-1010RGBC-WS2812B
LED3: library part NCD0603Y2, "yellow 0603 Light Emitting Diodes (LED) ROHS", LCSC Part Number=C89811, Manufacturer="Foshan NationStar Optoelectronics", Package=0603, ComponentLink1Description=LCSC, ComponentLink1URL=https://www.lcsc.com/product-detail/Light-Emitting-Diodes-LED_Foshan-NationStar-Optoelectronics-NCD0603Y2_C89811.html, Item Type=LED, Manufacturer Part Number=NCD0603Y2
LED4: library part NCD0603R3, "RED LED 0603 Light Emitting Diodes", LCSC Part Number=C3151730, Manufacturer="Foshan NationStar Optoelectronics", Package=0603, ComponentLink1Description=LCSC, ComponentLink1URL=https://www.lcsc.com/product-detail/Light-Emitting-Diodes-LED_Foshan-NationStar-Optoelectronics-NCD0603R3_C3151730.html, Item Type=LED, Manufacturer Part Number=NCD0603R3
LED5: library part NCD0603G2, "Emerald 0603 Light Emitting Diodes (LED) ROHS", LCSC Part Number=C87326, Manufacturer="Foshan NationStar Optoelectronics", Package=0603, ComponentLink1Description=LCSC, ComponentLink1URL=https://www.lcsc.com/product-detail/Light-Emitting-Diodes-LED_Foshan-NationStar-Optoelectronics-NCD0603G2_C87326.html, Item Type=LED, Manufacturer Part Number=NCD0603G2
LED6: "Colorless transparence Side stickers -40℃~+85℃ Common anode RGB 120° 60mW SMD,1.5x3.2mm Light Emitting Diodes (LED) ROHS", LCSC Part Number=C496820, Manufacturer=MEIHUA, Package=SMD,1.5x3.2mm, ComponentLink1Description=LCSC, ComponentLink1URL=https://www.lcsc.com/product-detail/Light-Emitting-Diodes-LED_MEIHUA-MHS110FRGBCT_C496820.html, Item Type="RGB LED", Manufacturer Part Number=MHS110FRGBCT
MK1: "1.5V~3.6V Omnidirectional 120uA -42dB 400Ω 59dB SMD-4P,1.9x2.8mm MEMS Microphones ROHS", LCSC Part Number=C481300, Manufacturer=Zilltek, ComponentLink1Description=LCSC, ComponentLink1URL=https://www.lcsc.com/product-detail/MEMS-Microphones_ZILLTEK-ZTS6117_C481300.html, Item Type=Microphone, Manufacturer Part Number=ZTS6117
Q1 Q2 Q3 Q4: "TRANS PREBIAS NPN 50V SOT23-3", LCSC Part Number=C508183, Manufacturer=Diodes, ComponentLink1Description=http://uk.rs-online.com/webdocs/1321/0900766b81321d3c.pdf?src-supplier=Rs, ComponentLink1URL=http://uk.rs-online.com/webdocs/1321/0900766b81321d3c.pdf?src-supplier=Rs, ComponentLink2Description=http://components.arrow.com/part/dataview/41508542S9348013N2867?src-supplier=Arrow+Electronics, ComponentLink2URL=http://components.arrow.com/part/dataview/41508542S9348013N2867?src-supplier=Arrow+Electronics, ComponentLink3Description=http://www.mouser.com/ds/2/115/ds30330-71322.pdf?src-supplier=Mouser, ComponentLink3URL=http://www.mouser.com/ds/2/115/ds30330-71322.pdf?src-supplier=Mouser, ComponentLink4Description=http://www.alliedelec.com/m/d/be0b5f6f3c5081911d08f51c92d34358.pdf?src-supplier=Allied+Electronics, ComponentLink4URL=http://www.alliedelec.com/m/d/be0b5f6f3c5081911d08f51c92d34358.pdf?src-supplier=Allied+Electronics, ComponentLink5Description=https://www.diodes.com/assets/Datasheets/ds30330.pdf?src-supplier=Digikey, ComponentLink5URL=https://www.diodes.com/assets/Datasheets/ds30330.pdf?src-supplier=Digikey, ComponentLink6Description=https://datasheet.octopart.com/DDTC143ZCA-7-F-Diodes-Inc.-datasheet-46751235.pdf?src-supplier=Farnell, ComponentLink6URL=https://datasheet.octopart.com/DDTC143ZCA-7-F-Diodes-Inc.-datasheet-46751235.pdf?src-supplier=Farnell, ComponentLink7Description=http://www.diodes.com//datasheets/ds30330.pdf?src-supplier=Avnet, ComponentLink7URL=http://www.diodes.com//datasheets/ds30330.pdf?src-supplier=Avnet, ComponentLink8Description=http://www.diodes.com/_files/datasheets/ds30330.pdf?src-supplier=Future+Electronics, ComponentLink8URL=http://www.diodes.com/_files/datasheets/ds30330.pdf?src-supplier=Future+Electronics, Item Type=BJTs, Manufacturer Part Number=DDTC143ZCA-7-F, Pricing="1000=0.669, 2000=0.635, 3000=0.445, 6000=0.424 (DKK)", RoHS=Yes, Stock=6400, Supplier=Rs
Q5: "50V 220mA 3.5Ω@10V,220mA 225mW 1.6V@1mA N Channel SOT-23 MOSFETs ROHS", LCSC Part Number=C426569, Manufacturer="Slkor(SLKORMICRO Elec.)", Package=SOT-23, ComponentLink1Description=LCSC, ComponentLink1URL=https://www.lcsc.com/product-detail/MOSFETs_Slkor-SLKORMICRO-Elec-BSS138_C426569.html, Item Type=Mosfet, Manufacturer Part Number=BSS138